# Altium PCB TYPEC_4KTransmitter-v1.0.PcbDoc (part 8 of 12)
Units mil, origin at the board's own origin, x right, y up, seen from the top; angles counter-clockwise.
Board outline 2834.7 x 1259.84 mil, 10 copper layers (Top Layer, GND-1, Signal L1, GND-2, PWR-1, PWR-2, GND-3, Signal L2, GND-4, Bottom Layer), stack 61.686 mil thick; 475 components, 338 nets, 2161 pads, 1240 vias.
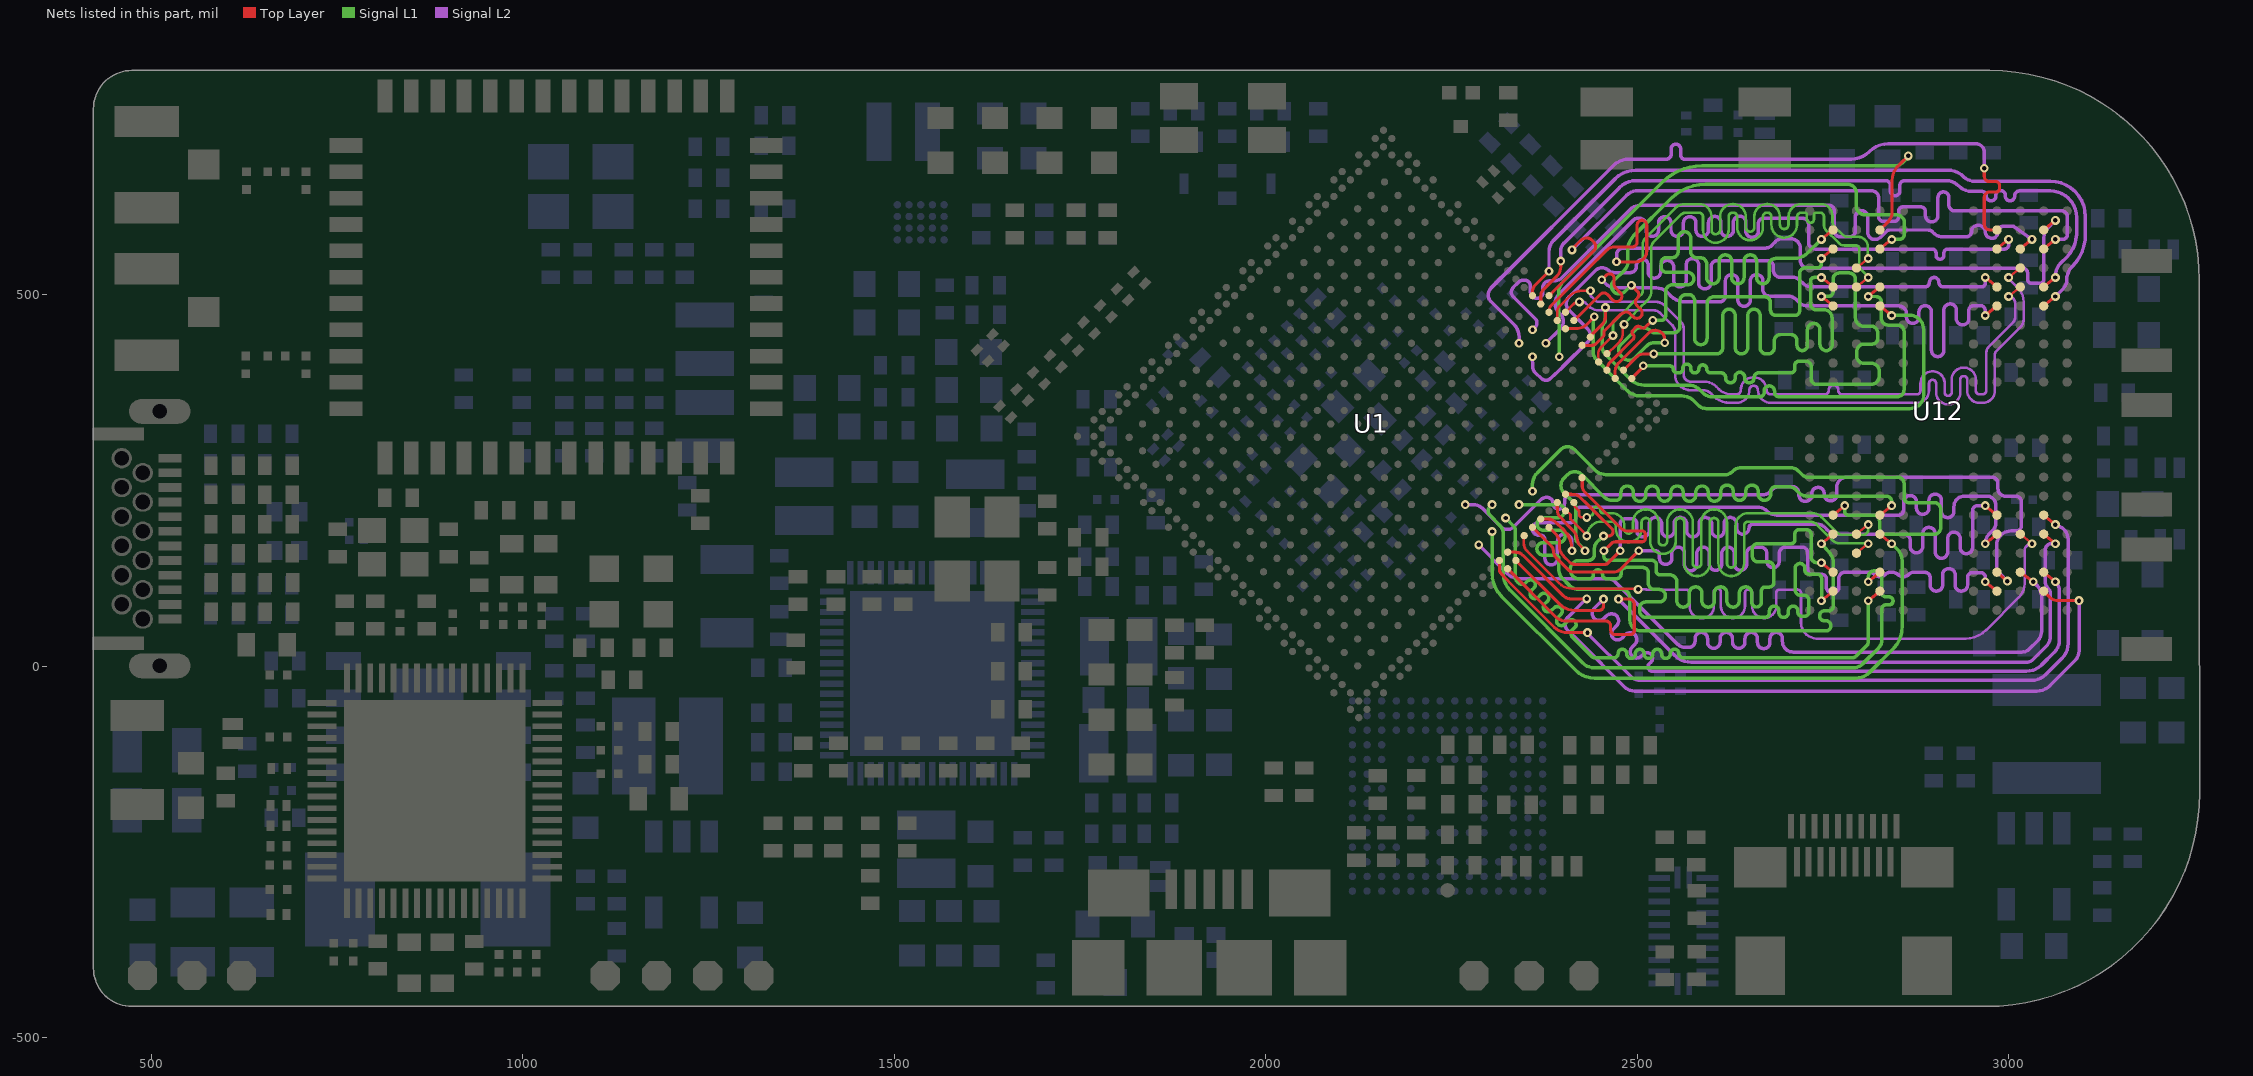
[diagram p14: the nets of this part, all layers, seen from the top]

## Via types
v1: diameter 11.81, hole 5.91, Top Layer to Bottom Layer, tented both sides, 710 vias
v2: diameter 15.75, hole 7.87, Top Layer to Bottom Layer, tented both sides, 265 vias
v3: diameter 11.81, hole 5.91, Top Layer to Signal L1, tented both sides, 146 vias
v4: diameter 11.81, hole 5.91, Signal L2 to Bottom Layer, 60 vias
v5: diameter 11.81, hole 5.91, Signal L1 to Signal L2, 38 vias
v6: diameter 11.81, hole 5.91, Top Layer to Signal L1, 16 vias
v7: diameter 11.81, hole 5.91, Top Layer to Bottom Layer, 4 vias
v8: diameter 11.81, hole 5.91, Signal L1 to Signal L2, tented both sides, 1 vias

## Nets (pads, with @x,y where several pads share a name; then routed paths per layer and width w, separated by ;. In a path a pad name is that pad's centre, name@x,y a point inside that pad or via, vN(x,y) a via of type N, cw(c..) or ccw(c..) an arc to the next point about the centre after c; other vN are vias at no path point) (continued)
LPDDR4_DM1_A: U1.1G1 U12.C10 | length 1004.7
  Top Layer w4.2: U12.C10@3015.82,561.35 v1(3031.57,574.14)
  Signal L2 w4.7: v1@2360.18,453.49 2362.87,456.18 ccw(c2357.21,461.84) 2365.21,461.84 ccw(c2357.21,461.84) 2362.87,467.49 2333.54,496.83 cw(c2340,503.3) 2330.86,503.3 cw(c2340,503.3) 2333.54,509.77 2339.93,516.16 cw(c2348.07,508) 2348.07,519.53 cw(c2348.07,511.13) 2356.47,511.13 2356.47,503.11 ccw(c2364.87,503.11) 2373.27,503.11 2373.27,509.83 cw(c2381.67,509.83) 2381.67,518.23 2388.14,518.23 ccw(c2388.14,533.23) 2398.75,522.62 ; 2398.85,522.72 2490.56,614.43 cw(c2504.07,600.93) 2504.07,620.03 2758.5,620.03 cw(c2758.5,613.2) 2765.33,613.2 2765.33,585.93 ccw(c2773.73,585.93) 2773.73,577.53 2785.47,577.53 ccw(c2785.47,585.93) 2793.87,585.93 2793.87,604.37 cw(c2802.27,604.37) 2810.67,604.37 2810.67,583.19 ccw(c2819.64,583.19) 2819.64,574.22 ccw(c2819.64,586.85) 2827.76,577.18 2835.83,585.26 cw(c2839.67,581.41) 2839.67,586.85 2891.41,586.85 cw(c2891.41,577.22) 2898.21,584.03 2900.31,581.93 ccw(c2910.94,592.56) 2910.94,577.53 2942.58,577.53 ccw(c2942.58,585.23) 2950.29,585.23 cw(c2957.99,585.23) 2957.99,592.94 cw(c2959.6,584.01) 2968.68,584.07 2969.45,581.15 ccw(c2974.86,582.58) 2970.95,578.58 ccw(c2978.26,585.95) 2977.51,575.59 2977.75,575.59 2978.34,575.59 2980.14,575.98 ccw(c2978.94,581.45) 2982.88,577.47 ccw(c2974.95,585.43) 2986.19,585.39 cw(c2992.55,585.41) 2992.55,591.77 3006.86,591.77 v1(3031.57,574.14)
  other v1: 2359.18,452.49
LPDDR4_DM1_B: U1.1A11 U12.Y10 | length 1035.7
  Top Layer w4.2: U12.Y10@3015.82,126.31 v1(3033.23,113.54)
  Signal L2 w4.7: v1(2286.8,162.97) 2325.5,124.27 ; 2325.53,124.24 ccw(c2341.74,140.44) 2341.74,117.53 ; 2341.77,117.53 2459.97,117.53 2460.03,117.53 cw(c2460.01,102.01) 2470.99,112.98 ; 2471.01,112.96 2555.16,28.81 ccw(c2564.29,37.94) 2564.29,25.03 2569.64,25.03 ccw(c2569.64,33.43) 2578.04,33.43 2578.04,36.91 cw(c2586.44,36.91) 2594.84,36.91 2594.84,32.21 ccw(c2603.24,32.21) 2611.64,32.21 2611.64,36.91 cw(c2620.04,36.91) 2628.44,36.91 2628.44,32.21 ccw(c2636.84,32.21) 2645.24,32.21 2645.24,36.91 cw(c2653.64,36.91) 2662.04,36.91 2662.04,31.72 ccw(c2670.44,31.72) 2678.84,31.72 2678.84,36.91 cw(c2687.24,36.91) 2695.64,36.91 2695.64,33.43 ccw(c2710.37,33.43) 2710.37,18.7 3017.65,18.7 ; 3017.68,18.7 ccw(c3017.68,33.46) 3028.12,23.03 3039.26,34.16 ccw(c3026.82,46.6) 3044.41,46.6 3044.41,93.76 ccw(c3023.74,93.79) 3038.35,108.41 v1(3033.23,113.54)
LPDDR4_DQ0_A: U1.G2 U12.B2 | length 748.4
  Top Layer w4.2: U1.G2@2459.41,398.21 cw(c2474.7,398.21) 2459.97,402.33 cw(c2474.7,398.21) 2463.89,409.02 2494.61,439.74 ccw(c2491.48,442.88) 2494.61,446.01 cw(c2497.75,449.15) 2494.61,452.28 2498.31,455.98 cw(c2501.45,452.85) 2504.58,455.98 ccw(c2507.72,459.12) 2510.54,455.7 2510.83,455.96 v1(2521.06,465.19) ; v1(2748.1,574.14) U12.B2@2763.85,586.94
  Signal L1 w4.7: v1(2521.06,465.19) 2521.25,465.38 2532.63,465.38 ccw(c2532.63,471.08) 2538.33,471.08 2538.33,503.65 cw(c2547.74,503.65) 2547.74,513.06 2568.09,513.06 ccw(c2568.09,521.46) 2568.09,529.86 2539.94,529.86 cw(c2539.94,537.44) 2532.36,537.44 2532.36,542.57 cw(c2539.33,542.57) 2539.33,549.55 2546.94,549.55 ccw(c2546.94,557.95) 2555.34,557.95 2555.34,576.19 cw(c2563.74,576.19) 2572.14,576.19 2572.14,557.95 ccw(c2580.54,557.95) 2580.54,549.55 2585.22,549.55 cw(c2585.22,541.15) 2593.62,541.15 2593.62,522.94 ccw(c2602.02,522.94) 2610.42,522.94 2610.42,545.04 cw(c2618.82,545.04) 2627.22,545.04 2627.22,522.94 ccw(c2635.62,522.94) 2644.02,522.94 2644.02,545.04 cw(c2652.42,545.04) 2660.82,545.04 2660.82,522.94 ccw(c2669.22,522.94) 2677.62,522.94 2677.62,539.61 cw(c2686.56,539.61) 2686.56,548.55 2711.37,548.55 ccw(c2711.37,574.68) 2729.86,556.2 2747.76,574.11 v1(2748.1,574.14)
LPDDR4_DQ0_B: U1.B12 U12.AA2 | length 857.7
  Top Layer w4.2: U1.B12@2403.73,231.17 2411.83,231.17 2415.41,230.99 cw(c2414.86,220.04) 2422.47,227.94 2433.76,217.09 2445.05,205.79 2466.33,184.52 cw(c2462.71,180.9) 2467.83,180.9 cw(c2462.71,180.9) 2466.33,177.28 2465.95,176.9 cw(c2461.42,181.44) 2461.42,175.03 v1(2454.86,175.03) ; v1(2748.1,87.92) U12.AA2@2763.85,100.72
  Signal L1 w4.7: v1(2454.86,175.03) 2446.55,167.3 ccw(c2454.86,158.36) 2442.65,158.36 2442.65,150.65 cw(c2434,150.65) 2434,142 2422,142 ccw(c2422,129.82) 2409.82,129.82 ccw(c2422.12,129.82) 2422.12,117.53 2436.69,117.53 ccw(c2436.69,121.67) 2440.84,121.67 2440.84,122.97 cw(c2447.19,122.97) 2447.19,129.32 cw(c2447.19,122.97) 2453.54,122.97 ccw(c2458.98,122.97) 2458.98,117.53 2472.21,117.53 ccw(c2472.21,123.75) 2478.43,123.75 2478.43,126.13 cw(c2484.89,126.13) 2484.89,132.59 2508,132.59 cw(c2508,125.44) 2515.16,125.44 2515.16,111.41 ccw(c2523.56,111.41) 2522.25,103.11 2529.68,103.11 cw(c2529.68,94.61) 2529.78,103.11 cw(c2529.68,94.61) 2538.18,94.61 cw(c2529.78,94.61) 2529.78,86.21 2511.42,86.21 ccw(c2511.42,78.19) 2503.4,78.19 2503.4,74.21 ccw(c2512.25,74.21) 2512.25,65.36 2671.86,65.36 ccw(c2671.86,71.71) 2673.89,65.69 ccw(c2671.86,71.71) 2678.21,71.71 2678.21,74.21 cw(c2684.59,74.21) 2684.62,80.59 cw(c2684.59,74.27) 2690.91,74.27 2690.91,71.71 ccw(c2697.26,71.71) 2697.26,65.36 ccw(c2697.26,71.71) 2703.61,71.71 2703.61,74.21 cw(c2709.99,74.21) 2709.99,80.59 cw(c2709.99,74.28) 2716.31,74.28 2716.31,72.76 ccw(c2722.35,72.76) 2722.35,66.72 2725.42,66.72 ccw(c2725.42,72.14) 2730.84,72.14 2730.84,89.67 ccw(c2725.48,89.67) 2725.48,95.03 2720.54,95.03 cw(c2720.54,102.91) 2712.66,102.91 2712.66,131.46 cw(c2719.26,131.45) 2725.8,132.38 2725.8,128.85 ccw(c2730.91,128.85) 2730.91,123.74 2742.64,123.74 cw(c2742.64,118.08) 2748.31,118.08 v1@2748.31,88.12
LPDDR4_DQ1_A: U1.F2 U12.C2 | length 749
  Top Layer w4.2: U1.F2@2470.54,387.07 2470.54,397 cw(c2485.54,397) 2474.94,407.61 2515.48,448.16 cw(c2524.51,439.16) 2524.56,451.91 cw(c2524.51,439.06) 2537.36,439.06 v1(2537.36,435.03) ; v1(2748.1,548.54) U12.C2@2763.85,561.35
  Signal L1 w4.7: 2496.22,414.07 cw(c2489.75,420.56) 2489.55,411.4 cw(c2489.75,424.44) 2480.54,415.21 2479.09,416.67 cw(c2488.38,426.01) 2475.2,426.06 cw(c2484.04,426.06) 2477.78,432.3 2498.06,452.58 cw(c2505.64,445.01) 2504.9,455.69 ; 2496.27,414.13 2512.94,430.8 cw(c2523.12,420.67) 2523.12,435.03 v1(2537.36,435.03) ; 2505.48,455.69 cw(c2505.48,434.76) 2520.29,449.56 ccw(c2522.4,451.67) 2522.4,448.69 2549.86,448.69 ccw(c2549.86,456.38) 2557.43,455.08 2557.43,491.19 cw(c2566.17,491.19) 2566.17,499.92 2569.48,499.92 cw(c2569.48,491.99) 2577.42,491.99 2577.42,440.87 ccw(c2585.82,440.87) 2594.22,440.87 2594.22,487.97 cw(c2603.2,487.97) 2603.2,496.95 2671.66,496.95 cw(c2671.66,489.1) 2679.52,489.1 2679.52,479.09 ccw(c2686.58,479.09) 2686.58,472.03 2712.68,472.03 ccw(c2712.68,478.21) 2718.87,478.21 2718.87,528.24 cw(c2726.53,528.24) 2726.53,535.91 2742.89,535.91 ccw(c2742.89,541.12) 2748.1,541.12 v1(2748.1,548.54)
LPDDR4_DQ1_B: U1.B10 U12.Y2 | length 867.6
  Top Layer w4.2: U1.B10@2426,253.44 2426.16,245.59 2426.16,241.68 2426.24,241.05 ccw(c2437.14,242.31) 2429.16,234.77 ; 2429.16,234.77 2478.99,184.94 ccw(c2486.64,192.59) 2486.64,181.78 2506.68,181.78 cw(c2506.68,177.38) 2511.08,177.38 2511.08,171.52 cw(c2506.73,171.52) 2506.73,167.18 2471.01,167.18 ccw(c2471.01,159.36) 2466.03,165.39 ccw(c2471.01,159.36) 2465.48,164.89 ccw(c2468.24,161.85) 2465.38,164.8 v1(2455.36,155.03) ; v1(2748.1,139.1) U12.Y2@2763.85,126.31
  Signal L1 w4.7: v1(2455.36,155.03) 2455.36,147.61 ccw(c2460.85,147.61) 2460.85,142.13 2519.99,142.13 cw(c2519.99,136.29) 2525.83,136.29 2525.83,127.56 ccw(c2530.64,127.56) 2530.64,122.75 2543.62,122.75 cw(c2543.62,112.74) 2553.62,112.74 2553.62,87.68 ccw(c2562.02,87.68) 2570.42,87.68 2570.42,98.17 cw(c2578.82,98.17) 2587.22,98.17 2587.22,87.68 ccw(c2595.62,87.68) 2604.02,87.68 2604.02,98.17 cw(c2612.42,98.17) 2620.82,98.17 2620.82,87.68 ccw(c2629.22,87.68) 2637.62,87.68 2637.62,98.17 cw(c2646.02,98.17) 2654.42,98.17 2654.42,85.83 ccw(c2660.86,85.83) 2667.29,85.83 2667.29,101.18 cw(c2672.43,101.18) 2672.43,106.32 2678.25,106.32 ccw(c2678.25,111.98) 2683.91,111.98 2683.91,132.75 ccw(c2676.43,132.75) 2676.43,140.23 2663.07,140.23 cw(c2663.07,148.32) 2654.98,148.32 2654.98,157.2 cw(c2662.59,157.2) 2662.59,164.81 2707.65,164.81 ccw(c2707.65,169.57) 2712.42,169.57 2712.42,177.79 cw(c2718.28,177.79) 2718.28,183.65 2727.56,183.65 cw(c2727.56,176.88) 2734.33,176.88 2734.33,146.99 ccw(c2742.22,146.99) 2742.22,139.1 v1(2748.1,139.1)
LPDDR4_DQ2_A: U1.F1 U12.E2 | length 742.8
  Top Layer w4.2: U1.F1@2481.68,398.2 2499.11,415.63 cw(c2509.71,405.03) 2509.71,420.03 v1(2522.36,420.03) ; v1(2748.1,522.96) U12.E2@2763.85,510.17
  Signal L1 w4.7: v1(2522.36,420.03) 2606.91,420.03 ccw(c2606.91,428.43) 2615.31,428.43 2615.31,471.73 cw(c2623.71,471.73) 2632.11,471.73 2632.11,428.43 ccw(c2640.51,428.43) 2648.91,428.43 2648.91,471.73 cw(c2657.31,471.73) 2665.71,471.73 2665.71,428.43 ccw(c2674.11,428.43) 2674.11,420.03 2676.16,420.03 ccw(c2676.16,428.43) 2684.56,428.43 2684.56,437.47 cw(c2693.28,437.47) 2693.28,446.19 2706.61,446.19 cw(c2706.61,437.62) 2715.18,437.62 2715.18,431.7 ccw(c2722.27,431.66) 2729.36,431.65 ; 2729.36,431.68 2729.36,452.71 cw(c2737.76,452.76) 2746.16,452.76 2746.16,433.06 ccw(c2754.67,433.06) 2754.67,424.54 ccw(c2754.67,432.34) 2762.47,432.34 2762.47,468.49 2762.47,468.55 ccw(c2751.38,468.54) 2751.37,479.63 2740.49,479.63 ; 2740.45,479.63 cw(c2740.56,486.66) 2733.53,486.67 2733.53,486.72 2733.53,502.69 2733.53,518.16 cw(c2738.33,518.16) 2738.33,522.96 v1(2748.1,522.96)
LPDDR4_DQ2_B: U1.1A8 U12.V2 | length 847.1
  Top Layer w4.2: v1(2748.1,164.69) U12.V2@2763.85,177.49
  Signal L1 w4.7: v1(2341.09,217.25) 2393.7,217.26 cw(c2393.7,208.65) 2402.3,208.65 cw(c2393.33,208.65) 2393.33,199.69 2373.69,199.69 ccw(c2373.69,191.29) 2373.69,182.89 2394.76,182.89 cw(c2394.76,174.49) 2394.76,166.09 2373.66,166.09 ccw(c2373.66,157.69) 2373.66,149.29 2389.54,149.29 cw(c2389.54,143.96) 2394.86,143.96 ; 2394.89,143.96 2394.89,128.66 ccw(c2409.89,128.71) 2399.27,118.11 2408.98,108.4 ccw(c2421.47,120.88) 2421.47,103.23 2479.32,103.23 cw(c2479.32,92.24) 2490.31,92.24 2490.31,62.02 ccw(c2505.03,62.02) 2505.03,47.3 2754.19,47.3 ccw(c2754.19,54.04) 2760.93,54.04 ccw(c2754.18,54.04) 2754.53,60.78 2753.25,60.79 2751.96,60.79 cw(c2752.31,67.53) 2745.56,67.53 cw(c2752.31,67.53) 2752.31,74.28 2757.74,74.28 ccw(c2757.74,80.59) 2764.06,80.59 2764.06,139.07 ccw(c2743.23,139.03) 2758.24,153.48 2757.88,153.85 v1(2748.1,164.69)
LPDDR4_DQ3_A: U1.E1 U12.F2 | length 739.7
  Top Layer w4.2: U1.E1@2492.81,387.19 2508.36,402.74 v1(2508.36,404.05) ; v1(2748.1,497.37) U12.F2@2763.85,484.58
  Signal L1 w4.7: v1@2508.59,403.81 2520.34,403.81 2544.74,403.81 cw(c2544.74,399.89) 2548.65,399.89 ccw(c2554,399.89) 2554,394.54 2556.35,394.54 ccw(c2556.35,399.89) 2561.7,399.89 2561.7,400.99 cw(c2567.05,400.99) 2572.4,400.99 2572.4,399.71 ccw(c2577.75,399.71) 2583.1,399.71 2583.1,399.89 cw(c2588.45,399.89) 2593.8,399.89 ccw(c2599.15,399.89) 2599.15,394.54 2612.94,394.54 cw(c2612.94,388.19) 2619.29,388.19 2619.29,387.41 ccw(c2625.64,387.41) 2631.99,387.41 2631.99,389.02 cw(c2638.34,389.02) 2644.69,389.02 2644.69,387.41 ccw(c2651.04,387.41) 2657.39,387.41 2657.39,388.19 cw(c2663.74,388.19) 2663.74,394.54 2678.05,394.54 2680.4,394.54 2707.22,394.54 ccw(c2707.22,399.55) 2712.22,399.55 2712.22,404.38 cw(c2718.23,404.38) 2718.23,410.38 2727.02,410.38 cw(c2727.02,403.1) 2734.3,403.1 2734.3,386.24 ccw(c2741.37,386.24) 2741.37,379.18 2815.65,379.18 ccw(c2815.63,389.35) 2825.79,388.85 ccw(c2821.09,389.05) 2825.79,389.05 2825.79,397.17 ccw(c2815.48,397.17) 2815.48,407.47 2804.86,407.47 cw(c2804.82,416.58) 2795.71,416.62 2795.71,423.33 cw(c2805.78,423.33) 2805.78,433.39 2816.68,433.39 ccw(c2816.68,440.45) 2823.74,440.45 2823.74,448.6 ccw(c2814.86,448.6) 2814.86,457.48 2804.95,457.48 cw(c2804.95,468.53) 2793.9,468.53 2793.9,520.68 ccw(c2785.6,520.68) 2785.6,528.97 2771.85,528.97 ccw(c2771.85,520.97) 2763.84,520.97 2763.84,503.99 cw(c2757.22,503.99) 2757.22,497.37 v1(2748.1,497.37)
LPDDR4_DQ3_B: U1.1A7 U12.U2 | length 847.3
  Top Layer w4.2: U12.U2@2763.85,203.08 v1(2779.6,215.87)
  Signal L1 w4.7: v1@2358.74,234.76 2359.18,244.11 ccw(c2353.58,244.37) 2359.18,244.37 cw(c2380.97,244.37) 2365.56,259.78 2396.92,291.14 cw(c2406.43,281.63) 2406.43,295.07 cw(c2406.43,281.63) 2415.92,291.15 2443.49,263.59 2443.53,263.54 ccw(c2458.08,278.13) 2458.08,257.53 ; 2458.11,257.53 2618.09,257.53 ccw(c2618.09,272.53) 2628.69,261.91 2629.01,262.24 cw(c2640.47,250.78) 2640.47,266.99 2706.48,266.99 cw(c2706.48,251.99) 2717.08,262.6 2722.11,257.57 ccw(c2730.3,265.76) 2730.3,254.18 2851.17,254.18 cw(c2851.17,246.06) 2859.29,246.06 2859.29,226.6 ccw(c2866,226.6) 2866,219.89 2899.67,219.89 cw(c2899.67,211.03) 2908.53,211.03 2908.53,185.88 cw(c2900.04,185.88) 2900.04,177.39 2832.09,177.39 cw(c2832.09,183.13) 2826.36,183.13 2826.36,195.09 ccw(c2818.36,195.09) 2818.36,203.09 2784.36,203.09 cw(c2784.36,207.84) 2779.6,207.84 v1(2779.6,215.87)
  other v1: 2359.18,235.35
LPDDR4_DQ4_A: U1.M2 U12.F4 | length 741.6
  Top Layer w4.2: U1.M2@2403.73,454.48 2420.36,454.48 ccw(c2420.36,469.82) 2430.06,457.94 2431.2,458.88 v3(2442.36,470.03) ; U12.F4@2826.84,484.58 v1@2842.6,472.16
  Signal L1 w4.7: v3(2442.36,470.03) 2441.12,468.79 2441.12,423.14 ccw(c2457.71,423.13) 2446.02,411.37 2446.07,411.31 2465.29,392.1 2486.71,370.67 ; 2486.74,370.65 ccw(c2503.55,387.46) 2503.55,363.68 ; 2503.59,363.68 2560.04,363.68 cw(c2560.04,340.42) 2576.49,356.87 2582.36,351 ccw(c2593.27,361.91) 2593.27,346.48 2867.35,346.48 ccw(c2867.35,364.88) 2885.74,364.88 2885.74,453.05 ccw(c2866.63,453.05) 2866.63,472.16 v1@2842.6,472.16
  other v1: 2842.6,471.78
LPDDR4_DQ4_B: U1.B13 U12.U4 | length 854.5
  Top Layer w4.2: U1.B13@2392.59,220.04 2392.59,214.08 2392.76,208.56 ccw(c2403.73,208.9) 2395.76,201.36 2408.92,187.46 2412.84,183.54 ; 2412.87,183.51 cw(c2395.02,166.13) 2419.26,171.9 2421.11,164.11 v1(2429.95,155.03) ; U12.U4@2826.84,203.08 v1(2842.59,215.87)
  Signal L1 w4.7: v1@2429.95,155.89 2420.01,165.83 cw(c2426.52,172.28) 2417.36,172.28 2417.36,213.17 ccw(c2407.42,213.13) 2414.45,220.15 2401.57,233.03 cw(c2411.35,242.85) 2397.49,242.91 cw(c2411.63,242.86) 2401.63,252.86 2406.02,257.25 cw(c2416.02,247.25) 2416.02,261.39 cw(c2416.02,246.96) 2426.23,257.17 2456.71,226.69 ; 2456.71,226.68 ccw(c2465.92,235.91) 2465.92,222.87 2471.32,222.87 ccw(c2471.32,229.82) 2478.27,229.82 2478.27,233.91 cw(c2486.67,233.91) 2495.07,233.91 2495.07,230.11 ccw(c2503.47,230.11) 2511.81,229.1 2511.87,229.16 2511.87,233.91 cw(c2520.27,233.91) 2528.67,233.91 2528.67,230.11 ccw(c2537.07,230.11) 2543.26,224.43 ccw(c2537.91,229.77) 2545.47,229.77 2545.47,233.91 cw(c2553.87,233.91) 2562.27,233.91 2562.27,230.11 ccw(c2570.67,230.11) 2579.07,230.11 2579.07,233.91 cw(c2587.47,233.91) 2595.87,233.91 2595.87,230.11 ccw(c2604.27,230.11) 2612.65,229.62 2612.65,235.19 ; 2612.67,235.21 cw(c2621.07,235.21) 2629.47,235.21 2629.47,231.4 ccw(c2637.87,231.4) 2646.27,231.4 2646.27,235.21 cw(c2654.67,235.21) 2663.07,235.21 2663.11,235.16 2663.11,230.51 ccw(c2671.47,231.4) 2679.87,231.4 2679.87,234.68 cw(c2686.66,234.68) 2686.66,241.47 2704.08,241.47 cw(c2704.08,228.35) 2713.36,237.63 2717.57,233.41 ccw(c2729.03,244.87) 2729.03,228.66 2835.34,228.66 cw(c2835.34,221.41) 2842.59,221.41 v1(2842.59,215.87)
LPDDR4_DQ5_A: U1.K1 U12.E4 | length 743
  Top Layer w4.2: U1.K1@2437.14,442.75 2437.14,444.01 2452.93,459.81 ccw(c2442.26,470.48) 2457.36,470.48 2457.36,476.73 v3(2457.36,482.53) ; v1(2811.1,497.33) U12.E4@2826.84,510.17
  Signal L1 w4.7: v3(2457.36,482.53) 2457.36,465.94 cw(c2449.73,465.94) 2455.13,460.56 2454.8,460.23 ccw(c2459.41,455.62) 2452.89,455.62 2452.89,443.62 2452.89,430.22 ccw(c2468.21,430.22) 2457.36,419.4 2461.9,414.86 2472.45,404.32 2491.04,385.73 ; 2491.07,385.69 ccw(c2509.34,403.96) 2509.34,378.13 ; 2509.37,378.13 2569.06,378.13 cw(c2569.06,356.65) 2584.25,371.84 2588.29,367.79 ccw(c2601.17,380.67) 2601.17,362.46 2665.28,362.46 ccw(c2665.28,368.29) 2670.92,366.84 2670.91,369.9 cw(c2677.98,369.92) 2685.05,369.9 2685.04,366.84 ccw(c2690.68,368.29) 2690.68,362.46 2850.14,362.46 ccw(c2850.14,371.61) 2859.29,371.61 2859.29,450.34 ccw(c2850.68,450.34) 2850.68,458.95 2837.74,458.95 cw(c2837.74,467.9) 2828.79,467.9 2828.79,490.15 ccw(c2821.61,490.15) 2821.61,497.33 v1(2811.1,497.33)
LPDDR4_DQ5_B: U1.1A10 U12.V4 | length 847
  Top Layer w4.2: U12.V4@2826.84,177.49 v1(2842.59,164.69)
  Signal L1 w4.7: v1(2304.9,181.06) 2304.9,124.49 ccw(c2347.82,124.36) 2317.38,94.1 2417.23,-5.76 2417.31,-5.83 ccw(c2442.91,19.72) 2442.99,-16.45 2794.01,-16.45 ; 2794.04,-16.45 ccw(c2794.06,10.07) 2812.83,-8.67 2846,24.5 ccw(c2815.87,51.9) 2856.59,51.89 ; v1(2842.59,164.69) 2850.76,156.53 cw(c2836.67,142.44) 2856.59,142.44 2856.59,51.94
LPDDR4_DQ6_A: U1.K2 U12.C4 | length 753.3
  Top Layer w4.2: U1.K2@2426,431.61 2439.17,431.61 ccw(c2439.15,439.52) 2444.74,433.93 2455.56,444.74 2455.56,450.68 2478.14,473.26 cw(c2485.76,465.64) 2485.76,476.42 cw(c2485.76,469.95) 2490.33,474.52 2494.87,469.98 ccw(c2499.84,474.98) 2504.83,479.96 2499.95,484.85 cw(c2504.94,489.83) 2499.95,494.81 ; v3(2492.36,512.53) 2500.48,504.4 cw(c2495.95,499.87) 2502.36,499.87 cw(c2495.95,499.87) 2500.48,495.35 ; U12.C4@2826.84,561.35 v1(2842.64,574.09)
  Signal L1 w4.7: 2487.36,558.84 2487.36,543.02 cw(c2472.73,543.02) 2483.09,532.7 2468.13,517.74 ccw(c2471.48,514.44) 2467.68,517.21 ccw(c2476.09,511.13) 2468.69,503.86 ccw(c2476.27,511.39) 2475.12,500.77 ccw(c2475.6,505.45) 2475.62,500.75 ccw(c2475.4,513.23) 2484.23,504.4 v3(2492.36,512.53) ; 2487.36,558.88 cw(c2516.54,558.88) 2495.9,579.51 2545.15,628.76 cw(c2592.73,581.18) 2592.73,648.47 2783.38,648.47 cw(c2783.38,637) 2794.86,637 2794.86,619.04 ccw(c2806.37,619.04) 2806.37,607.53 2848.49,607.53 cw(c2848.49,596.16) 2859.86,596.16 2859.86,581.37 cw(c2852.62,581.37) 2852.62,574.14 2842.69,574.14 v1(2842.64,574.09)
LPDDR4_DQ6_B: U1.1B9 U12.Y4 | length 847.1
  Top Layer w4.2: v1(2811.1,113.5) U12.Y4@2826.84,126.31
  Signal L1 w4.7: v1(2304.9,217.25) 2301.61,213.78 ccw(c2306.74,208.65) 2301.61,203.52 2315.49,188.88 2315.64,188.72 cw(c2304.68,177.99) 2320.02,178 2320.02,124 ccw(c2350.88,123.85) 2329.02,102.07 2329.08,102.01 2427.27,3.82 2427.33,3.77 ccw(c2441.91,18.28) 2441.96,-2.3 2791.09,-2.3 2791.18,-2.3 ccw(c2791.29,15.1) 2803.49,2.7 2825.07,24.28 ccw(c2814.33,35.03) 2829.53,35.03 ; v1(2811.1,113.5) 2811.1,119.49 cw(c2819.89,119.49) 2819.89,128.29 cw(c2819.89,118.65) 2829.53,118.65 2829.53,98.33 ccw(c2834.88,98.33) 2834.88,92.98 2839.2,92.98 cw(c2839.2,87.63) 2839.2,82.28 2834.88,82.28 ccw(c2834.88,76.93) 2829.53,76.93 2829.53,35.06
LPDDR4_DQ7_A: U1.1E1 U12.B4 | length 746
  Top Layer w4.2: U12.B4@2826.84,586.94 2837.9,597.99 ; 2837.91,598.01 ccw(c2825.02,610.86) 2843.23,610.86 2843.23,649.09 2843.23,653.66 cw(c2870.36,653.66) 2851.17,672.85 2854.41,676.08 v3(2864.86,686.53)
  Signal L1 w4.7: v1(2395.37,416.3) 2394.59,503.03 2394.59,503.09 cw(c2415.55,502.94) 2400.73,517.76 2534.02,651.05 cw(c2587.55,597.55) 2587.55,673.23 2846.84,673.23 ccw(c2846.84,688.23) 2857.44,677.61 v3@2864.86,685.03
LPDDR4_DQ7_B: U1.1A9 U12.AA4 | length 851.1
  Top Layer w4.2: v1(2811.1,87.92) U12.AA4@2826.84,100.72
  Signal L1 w4.7: v1(2322.99,199.16) 2334.02,188.14 cw(c2329.28,183.4) 2335.98,183.4 2335.98,132.59 2335.98,120.18 ccw(c2346.42,120.18) 2339.33,112.52 ccw(c2346.42,120.18) 2346.42,109.74 2346.99,109.74 ccw(c2344.91,115.96) 2349.56,111.34 2352.43,114.2 cw(c2356.92,109.71) 2361.41,114.2 cw(c2356.92,109.71) 2361.41,105.22 2357.76,101.58 ccw(c2362.25,97.08) 2357.76,92.59 ccw(c2362.25,97.08) 2366.74,92.59 2370.39,96.24 cw(c2374.88,91.75) 2379.37,96.24 cw(c2374.88,91.75) 2379.37,87.26 2375.72,83.61 ccw(c2380.21,79.12) 2375.72,74.63 ccw(c2380.21,79.12) 2384.7,74.63 2388.35,78.28 cw(c2392.84,73.79) 2397.33,78.28 cw(c2392.84,73.79) 2397.33,69.3 2393.75,65.72 2393.57,65.55 ccw(c2398.06,60.86) 2402.65,56.27 2406.78,60.41 2406.89,60.41 ; 2406.99,60.51 cw(c2411.51,55.85) 2417.46,53.23 ; 2417.36,53.13 2416.5,52.28 ; 2418.01,55.92 cw(c2412.86,55.92) 2416.5,52.28 ; v1(2811.1,87.92) 2811.1,31.93 cw(c2805.25,31.93) 2809.41,27.82 2794.66,13.06 cw(c2789.83,17.89) 2789.84,11.07 2561.9,11.07 cw(c2561.9,16.67) 2556.3,16.67 ccw(c2550.45,16.67) 2544.6,16.67 2544.58,15.74 cw(c2539.89,15.82) 2544.46,14.74 cw(c2538.75,16.1) 2533.03,14.78 cw(c2537.61,15.82) 2532.92,15.69 2532.92,15.74 2532.9,16.67 ccw(c2527.05,16.67) 2521.2,16.67 2521.2,16.1 cw(c2515.35,16.1) 2509.51,16.04 2509.51,16.13 2509.5,16.67 ccw(c2503.65,16.67) 2497.8,16.67 2497.8,16.1 cw(c2491.95,16.1) 2486.1,16.1 2486.1,16.67 ccw(c2480.25,16.67) 2474.4,16.67 cw(c2468.8,16.67) 2468.8,11.07 2443.9,11.07 cw(c2443.88,18.57) 2438.62,13.22 2413.1,38.74 cw(c2418.17,43.81) 2411,43.81 cw(c2418.17,43.81) 2413.09,48.87 2416.5,52.28
LPDDR4_DQ8_A: U1.P2 U12.B11 | length 1035
  Top Layer w4.2: U1.P2@2381.46,476.71 2382.06,479.8 cw(c2388.68,479.8) 2383.99,484.48 2459.41,559.9 cw(c2469.26,550.05) 2469.26,563.98 2493.24,563.98 ccw(c2493.24,570.76) 2500.02,570.76 2500.02,593.41 cw(c2506.52,593.41) 2513.02,593.41 2513.02,558.25 cw(c2498.8,558.25) 2498.8,544.03 v1(2472.36,544.03) ; U12.B11@3047.31,586.94 v1(3063.06,599.73)
  Signal L2 w4.7: v1(2472.36,544.03) 2472.36,553.01 cw(c2481.87,553.01) 2481.87,562.53 2672.87,562.53 ccw(c2672.87,574.05) 2681.01,565.89 2684.86,569.74 cw(c2695.2,562.47) 2695.2,575.11 2706.97,575.11 cw(c2706.97,562.47) 2719.61,562.47 2719.61,545.71 ; 2719.61,545.91 ccw(c2729.86,545.91) 2729.86,535.67 3018.56,535.67 cw(c3018.56,528.4) 3025.83,528.4 3025.83,520.24 ccw(c3031.03,520.24) 3031.03,515.04 3042.31,515.04 ccw(c3042.31,520.21) 3047.49,520.21 3047.49,577.05 ; 3047.49,577.07 cw(c3064.97,576.91) 3052.63,589.29 v1(3063.06,599.73)
LPDDR4_DQ8_B: U1.B19 U12.AA11 | length 1052.7
  Top Layer w4.2: U1.B19@2325.78,153.22 2337.08,153.06 cw(c2337.08,140.42) 2346,149.37 ; 2346.01,149.36 2400.65,94.72 ccw(c2411.31,105.38) 2411.31,90.3 v1(2432.36,90.37) ; U12.AA11@3047.31,100.72 3055.31,92.72 ccw(c3066.67,104.12) 3066.67,88.03 v1(3094.86,88.03)
  Signal L2 w4.7: v1(2432.36,90.37) 2431.57,90.37 2406.53,65.34 ccw(c2415.37,56.5) 2402.87,56.5 ccw(c2413.7,56.5) 2406.03,48.85 2421.94,32.94 2482.72,-27.83 ccw(c2496.66,-14.05) 2496.69,-33.66 3037.96,-33.66 ccw(c3038,-7.99) 3056.15,-26.14 3089.15,6.86 ccw(c3075.44,20.61) 3094.86,20.61 v1(3094.86,88.03)
LPDDR4_DQ9_A: U1.R1 U12.C11 | length 1019.1
  Top Layer w4.2: U1.R1@2381.46,498.57 2441.79,558.91 ccw(c2436.31,564.44) 2444.1,564.45 ccw(c2435.16,564.44) 2441.48,570.76 2438.83,573.41 ccw(c2432.29,566.8) 2432.25,576.1 ccw(c2432.29,564.36) 2423.93,572.61 2412.35,560.92 v1(2412.36,560.03) ; U12.C11@3047.44,561.35 v1@3063.11,574.08
  Signal L2 w4.7: v1(2412.36,560.03) 2485.46,633.13 cw(c2501.74,616.85) 2501.74,639.88 2815.47,639.88 cw(c2815.47,630.29) 2824.86,632.26 cw(c2815.47,630.29) 2825.06,630.29 2825.06,604.92 ccw(c2831.55,604.92) 2831.55,598.43 2846.03,598.43 ccw(c2846.03,604.4) 2852,604.4 2852,612.1 cw(c2857.93,612.1) 2857.93,618.03 2881.84,618.03 cw(c2881.84,611.7) 2888.17,611.7 2888.17,606.22 ccw(c2896.57,606.22) 2904.97,606.22 2904.97,630.65 ; 2904.97,630.69 cw(c2912.33,630.72) 2919.69,630.64 2919.69,630.5 2919.69,620.7 ccw(c2927.86,620.7) 2927.86,612.53 ; 2927.89,612.53 3071.54,612.53 ; v1(3063.06,574.14) 3072.8,574.14 ccw(c3072.8,580.54) 3079.2,580.54 3079.2,605.32 ccw(c3074.5,605.32) 3079.17,605.84 ccw(c3071.67,604.98) 3071.57,612.53
LPDDR4_DQ9_B: U1.A19 U12.Y11 | length 1052.3
  Top Layer w4.2: U1.A19@2336.92,142.09 2395.88,83.12 ccw(c2415.91,103.15) 2415.91,74.83 2448.75,74.83 ccw(c2448.75,80.93) 2454.86,80.93 v1(2454.86,90.03) ; U12.Y11@3047.31,126.31 v1(3063.06,113.51)
  Signal L2 w4.7: v1(2454.86,90.03) 2442.57,77.73 2442.53,77.69 ccw(c2449.49,70.68) 2439.61,70.68 ccw(c2448.92,70.68) 2455.52,64.12 2458.92,67.52 cw(c2465.65,60.76) 2472.39,54.01 2467.84,49.46 ; 2467.82,49.44 ccw(c2473.76,43.5) 2479.69,37.55 2484.26,42.12 cw(c2490.71,35.69) 2497.14,29.26 2493.44,25.55 ccw(c2499.54,19.4) 2505.7,13.31 ; 2505.72,13.33 2508.17,15.78 cw(c2513.44,10.53) 2518.68,5.26 2516.39,2.97 ccw(c2520.41,-1.05) 2514.72,-1.05 ccw(c2520.72,-1.05) 2520.72,-7.04 3006.33,-7.04 3023.98,-7.04 ccw(c3023.98,21.84) 3044.41,1.42 3061.69,18.7 ; 3061.71,18.71 ccw(c3045.45,34.94) 3068.42,34.94 3068.42,100.58 ccw(c3050.14,100.58) 3066.07,109.55 ccw(c3050.14,100.58) v1(3063.06,113.51)
LPDDR4_DQ10_A: U1.R2 U12.E11 | length 1012.1
  Top Layer w4.2: U1.R2@2370.32,487.29 2370.32,497.95 cw(c2382.54,497.93) 2373.9,506.56 2392.06,524.72 ccw(c2379.24,537.52) 2397.36,537.52 v1(2397.36,545.03) ; U12.E11@3047.31,510.17 v1(3063.06,522.96)
  Signal L2 w4.7: v1(2397.36,545.03) 2397.36,558.81 cw(c2412.36,558.81) 2401.75,569.42 2476.28,643.95 cw(c2498.69,621.56) 2498.72,653.24 2834.64,653.24 cw(c2834.64,646.89) 2840.99,646.89 2840.99,639.37 ccw(c2847.34,639.37) 2853.69,639.37 2853.69,646.89 cw(c2860.04,646.89) 2860.04,653.24 2917.92,653.24 cw(c2917.92,637.52) 2923.93,652.04 cw(c2912.68,624.87) 2933.46,645.68 ; 2933.49,645.65 ccw(c2949.75,661.94) 2949.77,638.93 2963.84,638.93 cw(c2963.84,632.58) 2970.19,632.58 2970.19,632.49 ccw(c2976.54,632.49) 2982.89,632.49 2982.89,633.63 cw(c2989.24,633.63) 2995.59,633.63 2995.59,632.49 ccw(c3001.94,632.49) 3008.29,632.49 cw(c3015.35,632.59) 3015.35,639.65 3055.83,639.65 cw(c3055.83,603.98) 3091.5,603.98 3091.5,580.97 cw(c3046,582.56) 3078.19,550.38 3070.63,542.81 ccw(c3088.89,524.55) 3063.06,524.55 v1(3063.06,522.96)
LPDDR4_DQ10_B: U1.A20 U12.V11 | length 1064.6
  Top Layer w4.2: U1.A20@2325.78,130.95 2390.24,66.5 2390.28,66.45 ccw(c2404.62,80.81) 2404.62,60.52 2457.8,60.52 cw(c2457.8,53.95) 2464.37,53.95 2464.37,48.48 ccw(c2470.37,48.48) 2470.37,42.48 2491.1,42.48 ccw(c2491.1,47.64) 2496.27,47.64 2496.27,82.76 ccw(c2489,82.76) 2489,90.03 v1(2475.06,90.03) ; U12.V11@3047.31,177.49 v1(3063.06,164.69)
  Signal L2 w4.7: v1(2475.06,90.03) 2551.09,14 ccw(c2572.74,35.65) 2572.74,5.03 3023.79,5.03 ccw(c3023.79,18.69) 3033.44,9.03 3050.17,25.75 ccw(c3035.27,40.65) 3056.34,40.65 3056.34,97.34 ccw(c3047.11,97.34) 3053.64,103.87 cw(c3063.99,114.19) 3049.36,114.2 3049.36,156.18 cw(c3057.88,156.18) 3057.88,164.69 v1(3063.06,164.69)
LPDDR4_DQ11_A: U1.T2 U12.F11 | length 1009.3
  Top Layer w4.2: U1.T2@2359.19,498.42 2359.19,503.74 cw(c2372.02,503.74) 2362.95,512.82 v1(2381.46,531.33) ; U12.F11@3047.31,484.58 v1(3063.06,497.37)
  Signal L2 w4.7: v1(2381.46,531.33) 2381.46,557.93 ; 2381.46,557.97 cw(c2402.34,557.98) 2387.59,572.76 2470.97,656.14 cw(c2497.98,629.16) 2497.98,667.34 2918.15,667.34 cw(c2918.15,636.61) 2939.88,658.34 ccw(c2953.91,672.37) 2953.91,652.53 3055.99,652.53 cw(c3055.99,605.08) 3103.44,605.08 3103.44,581.57 cw(c3042,580.78) 3085.44,537.32 ccw(c3102.65,520.14) 3078.33,520.14 cw(c3060.23,520.14) 3073.03,507.33 v1(3063.06,497.37)
LPDDR4_DQ11_B: U1.B20 U12.U11 | length 1053.1
  Top Layer w4.2: U1.B20@2314.65,142.09 2314.64,130.16 ccw(c2323.33,130.17) 2316.95,124.28 ; 2316.96,124.27 2330.35,110.28 2370.66,69.97 2388.22,52.41 ccw(c2406.04,70.08) 2406.04,44.99 ; 2406.08,44.99 v1@2432.36,44.99 ; U12.U11@3047.31,203.08 v1(3063.06,190.28)
  Signal L2 w4.7: v1@2432.36,44.99 2491.31,-13.96 ccw(c2504.49,-0.91) 2504.49,-19.46 ; 2504.52,-19.46 3030.69,-19.46 ccw(c3030.69,8.35) 3050.33,-11.34 3071.69,10.03 ccw(c3051.46,30.26) 3080.07,30.26 3080.07,170.73 ; v1(3063.06,190.28) 3069.37,187.41 cw(c3061.78,170.77) 3080.07,170.77
  other v1: 2433.36,44.99
LPDDR4_DQ12_A: U1.M1 U12.F9 | length 1020
  Top Layer w4.2: U1.M1@2414.86,465.02 2415.53,465.02 2450.83,500.31 cw(c2455.24,495.9) 2455.24,502.14 cw(c2455.24,495.9) 2459.66,500.31 2467.47,492.5 ccw(c2472.45,497.49) 2477.45,502.47 2471.59,508.32 cw(c2477.88,514.62) 2468.98,514.62 2468.98,522.31 ccw(c2463.5,522.31) 2468.82,523.63 ccw(c2463.5,522.31) 2463.5,527.79 ccw(c2463.5,519.63) 2457.73,525.4 v1(2452.36,520.03) ; v1(2968.58,471.78) U12.F9@2984.32,484.58
  Signal L2 w4.7: v1(2452.36,520.03) 2458,514.38 ccw(c2470.97,527.35) 2470.97,509.01 2525.66,509.01 cw(c2525.69,487.66) 2541.88,501.58 2545.41,498.05 ccw(c2564.8,517.47) 2564.8,490.03 ; 2564.83,490.03 2610.42,490.03 ; 2610.5,490.03 ccw(c2610.5,498.43) 2618.9,498.43 2618.9,518.55 cw(c2627.3,518.55) 2635.7,518.55 2635.7,492.68 ccw(c2644.1,492.68) 2652.5,492.68 2652.5,518.55 cw(c2660.9,518.55) 2669.3,518.55 2669.3,506.53 ccw(c2677.9,506.53) 2677.9,497.93 2703.63,497.93 cw(c2703.63,484.17) 2713.34,493.91 ; 2713.36,493.9 2717.57,489.68 ccw(c2729.78,501.89) 2729.78,484.63 2852.21,484.63 cw(c2852.21,474.26) 2862.58,474.26 2862.58,469.58 ccw(c2870.98,469.58) 2879.38,469.58 2879.38,476.63 cw(c2887.78,476.63) 2896.18,476.63 2896.18,424.92 ccw(c2904.58,424.92) 2912.98,424.92 2912.98,479.01 cw(c2921.38,479.01) 2929.78,479.01 2929.78,467.48 ccw(c2938.18,467.48) 2946.58,467.48 2946.58,478.7 cw(c2952.91,478.7) 2952.91,485.03 2962.36,485.03 cw(c2962.36,478.81) 2968.58,478.81 v1(2968.58,471.78)
LPDDR4_DQ12_B: U1.A15 U12.U9 | length 1049.7
  Top Layer w4.2: U1.A15@2381.46,186.63 2391.05,177.04 cw(c2380.13,166.13) 2395.56,166.13 2395.56,160.93 ccw(c2413.99,161) 2401.02,147.91 2408.98,139.95 ccw(c2416.44,147.34) 2416.44,136.84 2457.03,136.84 ccw(c2457,142.07) 2460.71,138.38 v1(2477.36,155.03) ; v1(2968.58,215.87) U12.U9@2984.32,203.08
  Signal L2 w4.7: v1(2477.36,155.03) 2477.36,191.75 cw(c2483.77,191.75) 2483.77,198.16 2493.58,198.16 cw(c2493.58,192.23) 2499.51,192.23 2499.51,182.21 ccw(c2507.91,182.21) 2516.31,182.21 2516.31,191.52 cw(c2524.71,191.52) 2533.11,191.52 2533.11,182.21 ccw(c2541.51,182.21) 2549.91,182.21 2549.91,191.52 cw(c2558.31,191.52) 2566.71,191.52 2566.71,182.21 ccw(c2575.11,182.21) 2583.51,182.21 2583.51,191.52 cw(c2591.91,191.52) 2600.31,191.52 2600.31,182.21 ccw(c2608.71,182.21) 2617.11,182.21 2617.11,191.52 cw(c2625.51,191.52) 2633.91,191.52 2633.91,185.93 ccw(c2642.31,185.93) 2642.31,177.53 ccw(c2642.31,185.93) 2650.71,185.93 cw(c2655.55,185.93) 2655.55,190.77 2742.72,190.77 cw(c2742.72,177.14) 2752.35,186.79 ; 2752.36,186.78 2756.36,182.79 ; 2756.37,182.77 ccw(c2769.05,195.48) 2769.05,177.53 2859.26,177.53 cw(c2859.26,169.13) 2867.66,169.13 2867.66,160.8 ccw(c2876.06,160.8) 2884.46,160.8 2884.46,178.25 cw(c2892.86,178.25) 2901.26,178.25 2901.26,153.43 ccw(c2909.66,153.43) 2918.06,153.43 2918.06,171.76 cw(c2926.46,171.76) 2934.86,171.76 2934.86,159.56 ccw(c2943.26,159.56) 2951.65,159.17 2951.66,209.17 cw(c2958.36,209.17) 2958.36,215.87 v1(2968.58,215.87)
LPDDR4_DQ13_A: U1.1F2 U12.E9 | length 1004.8
  Top Layer w4.2: v1(2968.58,522.96) U12.E9@2984.32,510.17
  Signal L2 w4.7: v1(2359.18,416.3) 2359.31,402.73 2359.31,402.66 ccw(c2371.13,403.07) 2362.83,394.64 2362.93,394.55 2371.82,386.67 ccw(c2377.35,392.86) 2383.04,386.81 2399.67,402.39 2434.74,437.46 ccw(c2428.03,444.04) 2437.36,445.13 ccw(c2421,443.13) 2432.64,454.81 2408.14,479.31 cw(c2416.57,487.73) 2404.65,487.73 cw(c2417.4,487.73) 2408.39,496.74 2410.78,499.14 2444.2,532.56 cw(c2452.99,523.76) 2452.99,536.2 cw(c2452.99,524.98) 2460.91,532.92 ccw(c2468.85,540.84) 2468.85,529.63 2491.18,529.63 ccw(c2491.21,537.3) 2498.86,537.86 2498.86,538.56 cw(c2507.59,538.56) 2507.59,547.3 cw(c2507.59,540.07) 2514.82,540.07 2514.82,530.56 ccw(c2523.3,530.56) 2531.79,530.56 2531.79,537.28 cw(c2540.53,537.28) 2549.28,537.28 2549.28,518.62 ccw(c2557.68,518.62) 2566.08,518.62 2566.08,539.99 cw(c2574.48,539.99) 2582.88,539.99 2582.88,515.94 ccw(c2591.28,515.94) 2599.68,515.94 2599.68,537.25 cw(c2608.08,537.25) 2608.08,545.65 2675.68,545.65 cw(c2675.68,537.98) 2683.34,537.98 2683.34,532.64 ccw(c2692.67,532.66) 2692.27,523.34 2692.39,523.34 2709.38,523.34 cw(c2709.38,509.93) 2718.87,519.41 2723.49,514.79 ccw(c2734.65,525.95) 2734.65,510.17 2884.86,510.17 2887.21,510.17 ccw(c2887.21,516.52) 2893.56,516.52 ; 2893.56,516.65 cw(c2899.91,516.65) 2906.26,516.65 ; 2906.26,516.52 ccw(c2912.61,516.52) 2912.61,510.17 2926.36,510.17 2963.64,510.17 ccw(c2963.64,515.11) 2968.58,515.11 v1(2968.58,522.96)
LPDDR4_DQ13_B: U1.B15 U12.V9 | length 1042.7
  Top Layer w4.2: U1.B15@2370.32,197.77 2381.62,197.6 cw(c2381.46,186.63) 2388.94,194.65 2401.86,182.61 2401.91,182.56 cw(c2376.71,157.35) 2412.36,157.35 v1(2412.36,155.03) ; v1(2968.58,164.69) U12.V9@2984.32,177.49
  Signal L2 w4.7: v1(2412.36,155.03) 2412.36,167.75 ccw(c2402.64,167.75) 2402.64,177.47 ccw(c2402.64,167.61) 2392.79,167.61 2392.79,144.52 cw(c2384.39,144.52) 2375.99,144.52 2375.99,169.83 ccw(c2369.81,169.83) 2369.81,176.01 2367.59,176.01 cw(c2367.56,184.44) 2367.59,192.86 2410.29,192.86 ccw(c2410.29,200.32) 2417.76,200.32 2417.76,207.62 cw(c2424.06,207.62) 2424.06,213.92 2661.68,213.92 cw(c2661.68,194.74) 2675.22,208.32 ccw(c2687.87,220.94) 2687.87,203.07 2851.77,203.07 ccw(c2851.77,209.96) 2858.65,209.96 2858.65,220.52 cw(c2867.59,220.52) 2867.59,229.46 cw(c2867.59,221.03) 2876.02,221.03 2876.02,212.53 ccw(c2884.42,212.53) 2892.82,212.53 2892.82,223.02 cw(c2901.22,223.02) 2909.62,223.02 2909.62,208.05 ccw(c2918.02,208.05) 2926.42,208.05 2926.42,214.41 cw(c2940.77,214.41) 2940.77,228.76 2970.66,228.76 cw(c2970.66,216.59) 2982.82,216.59 2982.82,192.58 cw(c2967.56,192.58) 2978.36,181.79 2973.75,177.18 ccw(c2986.24,164.69) v1(2968.58,164.69)
LPDDR4_DQ14_A: U1.1F1 U12.C9 | length 1004.9
  Top Layer w4.2: U12.C9@2984.32,561.35 v1(3000.07,574.14)
  Signal L2 w4.7: v1(2377.28,434.4) 2396.87,453.99 ccw(c2387.02,463.84) 2400.95,463.84 ccw(c2387.19,463.84) 2396.92,473.56 2394.24,476.24 cw(c2404.86,486.84) 2389.86,486.84 2389.86,488.81 cw(c2404.86,488.81) 2394.25,499.42 2495.13,600.3 cw(c2500.51,594.91) 2500.51,602.53 2503.67,602.53 cw(c2503.67,594.13) 2512.07,594.13 2512.07,586.64 ccw(c2520.47,586.64) 2528.87,586.64 2528.87,596.54 cw(c2537.27,596.54) 2545.67,596.54 2545.67,586.64 ccw(c2554.07,586.64) 2562.47,586.64 2562.47,596.54 cw(c2570.87,596.54) 2579.27,596.54 2579.27,586.64 ccw(c2587.67,586.64) 2596.07,586.64 2596.07,596.66 cw(c2604.47,596.66) 2612.87,596.66 2612.87,586.64 ccw(c2621.27,586.64) 2629.67,586.64 2629.67,597.08 cw(c2638.07,597.08) 2646.47,597.08 2646.47,585.37 ccw(c2654.87,585.37) 2663.27,585.37 2663.27,595.85 cw(c2669.94,595.85) 2669.94,602.53 2722.83,602.53 cw(c2722.83,594.56) 2729.19,599.37 cw(c2722.83,594.56) 2730.8,594.74 cw(c2722.83,594.56) 2730.8,594.56 2730.8,570.23 ; 2730.8,570.2 ccw(c2739.75,570.2) 2739.79,561.25 2897,561.25 cw(c2897,555.9) 2902.35,555.9 2902.35,552.81 ccw(c2907.7,552.81) 2913.05,552.81 2913.05,555.9 cw(c2918.4,555.9) 2918.4,561.25 2994.78,561.25 ccw(c2994.78,566.55) 3000.07,566.55 v1(3000.07,574.14)
LPDDR4_DQ14_B: U1.1C10 U12.Y9 | length 1035.4
  Top Layer w4.2: U12.Y9@2984.32,126.31 2998.37,114.18 v1(2998.41,114.24)
  Signal L2 w4.7: v1(2268.71,217.25) 2279.52,217.26 cw(c2279.52,199.54) 2292.04,212.07 2309.74,194.37 2317.04,187.2 ccw(c2325.39,195.64) 2327.26,183.92 ccw(c2325.17,196.56) 2334.26,187.53 2370.45,223.72 cw(c2378.54,215.63) 2378.54,227.07 ; 2378.58,227.07 cw(c2378.58,218.81) 2386.84,218.82 ; 2386.84,218.79 ccw(c2394.61,218.81) 2402.38,218.81 2402.38,222.11 cw(c2410.78,222.11) 2410.78,230.51 2668.82,230.51 ccw(c2668.82,245.51) 2679.42,234.89 2682.32,237.79 cw(c2691.21,228.88) 2691.21,241.47 2708.95,241.47 cw(c2708.95,232.83) 2717.59,232.83 2717.59,230.48 ccw(c2726.41,230.48) 2735.22,230.48 2735.22,232.07 cw(c2743.62,232.07) 2752.02,232.07 2752.02,230.48 ccw(c2760.42,230.48) 2768.82,230.48 2768.82,240.69 cw(c2782.3,240.69) 2782.3,254.17 2977.28,254.17 cw(c2977.28,245.75) 2985.7,245.75 2985.7,238.77 ccw(c2995.87,238.77) 2995.87,228.6 3009.65,228.6 cw(c3009.65,220.89) 3017.36,220.89 3017.36,188.83 cw(c3010.41,188.83) 3010.41,181.88 3003.34,181.88 ccw(c3003.34,162.65) 2984.11,162.65 2984.11,133.86 ; 2984.11,133.82 ccw(c2996.84,133.82) 2987.87,124.79 v1(2998.41,114.24)
LPDDR4_DQ15_A: U1.1G2 U12.B9 | length 1016.1
  Top Layer w4.2: v1(2967.36,670.03) 2967.36,659.09 ccw(c2974.41,659.09) 2974.41,652.04 2983.16,652.04 cw(c2983.16,647.46) 2987.74,647.46 2987.74,642.1 cw(c2983.58,642.1) 2983.58,637.94 2974.41,637.94 ccw(c2974.41,630.89) 2967.36,630.89 2967.36,594.36 ccw(c2974.78,594.36) 2974.78,586.94 U12.B9@2984.32,586.94
  Signal L2 w4.7: 2334.66,459.05 cw(c2319.09,443.51) 2341.09,443.51 v1(2341.09,434.4) ; 2334.65,459.06 2303.56,490.15 cw(c2312.59,499.22) 2299.79,499.23 cw(c2314.35,499.22) 2304.07,509.53 2467.89,673.35 cw(c2489.53,651.72) 2489.53,682.31 2539.51,682.31 ccw(c2539.51,688.66) 2545.86,688.66 2545.86,695.97 cw(c2552.21,695.97) 2558.56,695.97 2558.56,687.73 ccw(c2563.98,687.73) 2563.98,682.31 2788.26,682.31 ; 2788.29,682.31 ccw(c2788.29,717) 2812.81,692.47 cw(c2838.26,667.02) 2838.26,703.01 2955.49,703.01 ; 2955.53,703.01 cw(c2955.52,690.94) 2967.58,691.51 cw(c2962.89,691.31) 2967.59,691.31 v1@2967.59,670.26
LPDDR4_DQ15_B: U1.B16 U12.AA9 | length 1053.9
  Top Layer w4.2: U1.B16@2359.19,186.63 2384.97,160.84 cw(c2379.22,155.09) 2387.36,155.09 ccw(c2400.84,155.09) 2389.68,147.52 ccw(c2400.84,155.09) 2391.29,145.57 2407.82,129.05 ccw(c2413.79,135.08) 2413.84,126.59 2468.3,126.59 ccw(c2468.33,140.08) 2477.88,130.56 v1(2502.36,155.03) ; v1(2968.58,113.51) U12.AA9@2984.32,100.72
  Signal L2 w4.7: v1(2502.36,155.03) 2525.14,155.03 cw(c2525.14,150.07) 2530.1,150.07 2530.1,145.07 ccw(c2538.5,145.07) 2546.9,145.07 2546.9,151.63 cw(c2555.3,151.63) 2563.7,151.63 2563.7,136.65 ccw(c2572.1,136.65) 2580.5,136.65 2580.5,151.63 cw(c2588.9,151.63) 2597.3,151.63 2597.3,137.32 ccw(c2605.7,137.32) 2614.1,137.32 2614.1,151.63 cw(c2622.5,151.63) 2630.9,151.63 2630.9,137.32 ccw(c2639.3,137.32) 2647.7,137.32 2647.7,151.63 cw(c2656.1,151.63) 2656.1,160.03 2666.22,160.03 cw(c2666.22,151.63) 2674.62,151.63 2674.62,140.93 ccw(c2683.02,140.93) 2691.42,140.93 2691.42,151.63 cw(c2699.82,151.63) 2699.82,160.03 2722.3,160.03 cw(c2722.3,152.92) 2729.4,152.92 2729.4,130.33 ccw(c2736.27,130.33) 2736.27,123.46 2748.5,123.46 cw(c2748.5,117.14) 2754.83,117.14 2754.83,106.35 ccw(c2763.23,106.35) 2771.63,106.35 2771.63,118.28 cw(c2779.57,118.28) 2779.57,126.23 2810.37,126.23 ccw(c2810.34,131.83) 2810.54,126.23 cw(c2811.1,113.54) 2811.35,126.24 2812.2,126.23 ccw(c2812.28,131.83) 2812.28,126.23 cw(c2812.28,115.83) 2819.62,123.19 ccw(c2826.7,130.25) 2826.7,120.25 2827.41,120.25 ; 2826.91,120.25 ccw(c2826.91,130.25) 2833.99,123.18 ; 2834.2,123.4 cw(c2841.27,116.33) 2838.87,126.03 2841.79,126.22 ; 2841.87,126.2 ccw(c2841.83,131.8) 2842.04,126.2 cw(c2842.59,113.51) 2842.84,126.21 2843.69,126.2 ccw(c2843.78,131.8) 2843.78,126.2 cw(c2843.78,115.8) 2851.12,123.17 ccw(c2858.2,130.23) 2858.2,120.23 2858.91,120.23 ; 2858.41,120.23 ccw(c2858.41,130.23) 2865.48,123.16 ; 2865.7,123.37 cw(c2872.77,116.3) 2870.36,126.01 2873.29,126.19 2887.17,126.19 cw(c2887.17,118.9) 2894.46,118.9 2894.46,109.12 ccw(c2902.86,109.12) 2911.26,109.12 2911.26,122.85 cw(c2919.66,122.85) 2928.06,122.85 2928.06,109.12 ccw(c2936.46,109.12) 2944.86,109.12 2944.86,119.17 cw(c2951.42,119.17) 2951.42,125.73 2962.35,125.73 cw(c2962.35,119.28) 2968.8,119.28 v1@2968.8,114.89
LPDDR4_DQS0_A_N: U1.H1 U12.E3 | length 744.6
  Top Layer w3.5: U1.H1@2459.41,420.48 2460.51,420.47 2472.46,432.2 2475.26,435 ccw(c2462,448.26) 2479.22,440.83 ccw(c2462,448.26) 2480.76,448.26 2480.76,455.45 cw(c2486.94,455.45) v1(2482.57,459.82) ; U12.E3@2795.34,510.17 v1(2811.1,522.96)
  Signal L1 w3.5: v1@2482.57,460.84 v1(2482.57,459.82) 2490.4,468.57 2504.74,482.98 2511.86,490.14 2513.66,491.94 ; 2513.69,491.96 2514.13,492.41 ccw(c2502.19,504.37) 2519.09,504.37 ; 2519.09,504.42 2519.09,562.53 cw(c2531.45,562.53) 2522.7,571.26 ; 2522.71,571.27 2552.55,601.11 2558.32,606.88 cw(c2566.45,598.75) 2566.45,610.25 2583.05,610.25 cw(c2583.05,604.5) 2588.8,604.53 2588.8,602.03 2588.8,601.42 2588.8,586.51 ccw(c2605.62,586.52) 2605.89,569.7 ; 2605.91,569.7 ccw(c2605.59,587.42) 2623.3,587.42 2623.3,601.08 2623.3,604.58 cw(c2629.05,604.58) 2629.05,610.33 cw(c2629.05,604.58) 2634.8,604.58 2634.8,601.43 ; 2634.8,601.38 2634.8,598.95 2634.8,590.34 ccw(c2652.16,590.42) 2652.21,573.07 ccw(c2652.16,590.21) 2669.3,590.21 2669.3,604.58 cw(c2675.05,604.58) 2675.05,610.33 cw(c2675.05,604.58) 2680.76,605.26 cw(c2677.29,604.82) 2680.79,605.01 2680.8,604.74 cw(c2677.3,604.58) 2680.8,604.58 2680.8,593.88 ccw(c2698.09,593.89) 2698.16,576.6 ccw(c2698.09,593.83) 2715.31,593.77 2715.31,604.57 cw(c2718.81,604.57) 2715.32,604.79 2715.33,604.99 cw(c2718.82,604.77) 2715.35,605.18 ; 2715.35,605.21 cw(c2721.05,604.5) 2718.87,609.82 cw(c2721.05,604.5) 2721.05,610.25 2725.74,610.25 cw(c2725.74,607.4) 2728.59,607.4 2728.59,601.4 ccw(c2733.34,601.41) 2733.34,596.66 ; 2733.55,596.66 ccw(c2733.55,601.19) 2738.09,601.19 2738.09,607.19 cw(c2741.22,607.19) 2741.22,610.32 2746.01,610.32 cw(c2746.01,604.73) 2751.6,604.73 2751.6,592.41 ccw(c2759.2,592.41) 2753.83,587.04 2771.53,569.33 ccw(c2779.57,577.45) 2779.57,566.03 2794.02,566.03 cw(c2794.02,561.08) 2798.97,561.08 2798.97,538.7 ccw(c2804.81,538.7) 2800.67,534.57 v1@2811.1,524.14
LPDDR4_DQS0_A_P: U1.H2 U12.D3 | length 743.3
  Top Layer w3.5: U1.H2@2448.27,409.34 2447.91,420.09 cw(c2459.41,420.48) 2451.29,428.63 v1(2467.57,444.82) ; U12.D3@2795.34,535.76 v1@2811.08,548.54
  Signal L1 w3.5: v1(2467.57,444.82) 2467.57,456.06 2467.57,457.63 cw(c2478.38,457.63) 2470.73,465.27 2505.55,500.09 ccw(c2500.6,505.03) 2507.59,505.03 2507.59,567.7 cw(c2518.97,567.7) 2510.92,575.74 2518.86,583.68 2537.5,602.32 2551.77,616.59 2551.81,616.63 cw(c2564.26,604.05) 2564.26,621.75 2583.05,621.75 cw(c2583.05,604.5) 2600.3,604.58 cw(c2583.05,604.5) 2600.3,604.5 2600.3,602.03 2600.3,601.41 2600.3,586.52 ccw(c2605.62,586.52) 2605.74,581.2 ccw(c2605.59,587.42) 2611.8,587.42 2611.8,601.08 2611.8,604.58 cw(c2629.05,604.58) 2629.05,621.83 cw(c2629.05,604.58) 2646.3,604.58 2646.3,601.43 2646.3,598.95 2646.3,590.38 ccw(c2652.16,590.42) 2652.18,584.57 ccw(c2652.16,590.21) 2657.8,590.21 2657.8,604.58 cw(c2675.05,604.58) 2675.05,621.83 cw(c2675.05,604.58) 2692.18,606.64 cw(c2677.29,604.82) 2692.27,605.64 2692.28,605.44 cw(c2677.3,604.58) 2692.3,604.58 2692.3,593.88 ccw(c2698.09,593.89) 2698.11,588.1 ccw(c2698.09,593.83) 2703.81,593.8 2703.81,604.57 cw(c2718.81,604.57) 2703.84,605.51 2703.85,605.7 cw(c2718.82,604.77) 2703.94,606.65 cw(c2721.05,604.5) 2721.05,621.75 2739.57,621.75 2747.69,621.74 cw(c2747.68,618.24) 2747.83,621.73 cw(c2747.17,605.82) 2763.1,605.82 2763.1,605.74 2763.1,597.17 ccw(c2770.7,597.17) 2765.32,591.81 ; 2765.33,591.8 2776.22,580.9 ccw(c2784.38,589.07) 2784.38,577.53 2797.55,577.53 cw(c2797.55,564.61) 2810.47,564.61 2810.47,549.15 v1(2811.1,548.52)
LPDDR4_DQS0_B_N: U1.A12 U12.V3 | length 849.3
  Top Layer w3.5: U1.A12@2414.86,220.04 U1.A12@2416.08,218.82 ; 2416.08,214.45 2421.93,208.59 2421.93,202.48 2423.98,200.43 2431.95,200.43 v1(2432.36,200.03) ; U12.V3@2795.34,177.49 v1(2811.1,190.28)
  Signal L1 w3.5: v1@2432.67,198.84 v1(2432.36,200.03) 2438.74,202.72 ccw(c2437.38,205.95) 2440.88,205.95 2440.88,209.96 cw(c2445.63,209.68) 2450.38,209.68 ccw(c2454.27,209.68) 2454.27,205.79 2465.75,205.79 cw(c2465.75,188.54) 2483,188.54 2483,184 ccw(c2488.75,184) 2494.5,184 2494.5,193.52 cw(c2511.75,193.52) 2529,193.52 2529,168.1 ccw(c2534.75,168.1) 2540.5,168.1 2540.5,193.52 cw(c2557.75,193.52) 2575,193.52 2575,138.28 ccw(c2580.75,138.28) 2586.5,138.28 2586.5,193.52 cw(c2603.75,193.52) 2621,193.52 2621,138.28 ccw(c2626.75,138.28) 2632.5,138.28 2632.5,188.54 cw(c2649.75,188.54) 2649.75,205.79 2735.28,205.79 cw(c2735.28,187.4) 2748.29,200.41 2748.33,200.36 2769.52,179.17 ccw(c2775.54,185.25) 2775.54,176.7 2804.41,176.7 ccw(c2804.41,183.38) 2811.1,183.38 v1(2811.1,190.28)
LPDDR4_DQS0_B_P: U1.A13 U12.W3 | length 852.7
  Top Layer w3.5: U1.A13@2403.73,208.9 2405.36,208.9 2410.43,203.83 2410.43,197.72 2432.36,175.8 v1(2432.36,175.03) ; U12.W3@2795.34,151.9 v1(2811.1,164.69)
  Signal L1 w3.5: v1(2432.36,175.03) 2433.4,179.45 cw(c2452.15,175.03) 2452.15,194.29 2465.75,194.29 cw(c2465.75,188.54) 2471.5,188.54 2471.5,184 ccw(c2488.75,184) 2506,184 2506,193.52 cw(c2511.75,193.52) 2517.5,193.52 2517.5,168.1 ccw(c2534.75,168.1) 2552,168.1 2552,193.52 cw(c2557.75,193.52) 2563.5,193.52 2563.5,138.28 ccw(c2580.75,138.28) 2598,138.28 2598,193.52 cw(c2603.75,193.52) 2609.5,193.52 2609.5,138.28 ccw(c2626.75,138.28) 2644,138.28 2644,188.54 cw(c2649.75,188.54) 2649.75,194.29 2731.98,194.29 2732.98,194.29 cw(c2732.98,181.84) 2741.77,190.66 2742.49,189.94 2763.89,168.54 ; 2763.91,168.52 ccw(c2771.97,176.62) 2771.97,165.2 v1@2810.59,165.2
LPDDR4_DQS1_A_N: U1.N2 U12.E10 | length 1014
  Top Layer w3.5: U1.N2@2392.59,465.02 2392.59,476.72 cw(c2404.08,476.72) 2393.97,482.17 cw(c2404.08,476.72) 2395.96,484.84 2409.4,498.28 cw(c2425.68,482) 2425.68,505.03 v1(2437.36,505.03) ; v1(3000.07,497.37) U12.E10@3015.82,510.17
  Signal L2 w3.5: v1(2437.36,505.03) 2437.36,499.79 ccw(c2441.3,499.79) 2438.5,497.02 2443.1,492.42 ccw(c2448.72,498.21) 2448.72,490.14 2525.32,490.14 cw(c2525.32,473.51) 2537.12,485.23 2558.34,464 2558.95,463.39 cw(c2549.9,454.33) 2562.7,454.33 2562.7,453.46 2562.7,392.15 ccw(c2572.14,392.15) 2572.14,382.72 2590.25,382.72 ; 2590.43,382.72 cw(c2590.5,359.9) 2606.69,375.98 2606.8,375.87 2610.23,372.43 ccw(c2626.4,388.6) 2626.4,365.74 2633.9,365.74 ccw(c2633.9,371.49) 2639.65,371.49 cw(c2656.9,371.5) 2674.15,371.5 ccw(c2679.9,371.49) 2679.9,365.74 2745.06,365.74 2752.94,365.74 ccw(c2752.94,370.76) 2757.96,370.76 2757.96,370.89 cw(c2764.44,371.5) 2770.92,370.86 2770.92,370.74 ccw(c2775.93,370.74) 2775.93,365.74 2783.82,365.74 2876.71,365.74 ccw(c2876.71,370.49) 2881.46,370.49 2881.46,380.46 cw(c2897.71,380.46) 2913.96,380.46 2913.96,368.33 ccw(c2918.71,368.33) 2923.46,368.33 2923.46,385.46 cw(c2939.71,385.46) 2955.96,385.46 2955.96,370.49 ccw(c2960.71,370.49) 2960.71,365.74 2964.69,365.74 ccw(c2964.69,371.19) 2970.14,371.19 2970.14,420.56 2970.14,421.96 cw(c2981.37,422) 2973.43,429.94 3006.44,462.95 ccw(c3000.73,468.67) 3008.81,468.67 3008.81,488.63 ccw(c3000.07,488.63) 3005.1,495.78 ccw(c3000.07,488.63) v1(3000.07,497.37)
LPDDR4_DQS1_A_P: U1.N1 U12.D10 | length 1008
  Top Layer w3.5: U1.N1@2404.09,476.15 2404.09,476.72 2414.48,487.1 cw(c2421.55,480.02) 2421.55,490.03 v1(2422.36,490.03) ; v1(3000.07,522.96) U12.D10@3015.82,535.76
  Signal L2 w3.5: v1(2422.36,490.03) 2427.59,490.03 cw(c2427.59,486.09) 2430.37,488.88 2434.97,484.29 2435.21,484.05 ccw(c2448.72,498.21) 2448.72,478.64 2522.45,478.64 cw(c2522.45,466.58) 2530.97,475.11 2547.29,458.78 cw(c2537.85,449.34) 2551.2,449.34 2551.2,392.15 ccw(c2572.14,392.15) 2572.14,371.22 2588.33,371.22 ; 2588.42,371.22 cw(c2588.41,354.85) 2599.98,366.42 2600.02,366.38 2603.18,363.22 ccw(c2624.79,384.72) 2624.79,354.24 2633.9,354.24 ccw(c2633.9,371.49) 2651.15,371.49 cw(c2656.9,371.5) 2662.65,371.5 ccw(c2679.9,371.49) 2679.9,354.24 2876.71,354.24 ccw(c2876.71,370.49) 2892.96,370.49 2892.96,380.46 cw(c2897.71,380.46) 2902.46,380.46 2902.46,368.33 ccw(c2918.71,368.33) 2934.96,368.33 2934.96,385.46 cw(c2939.71,385.46) 2944.46,385.46 2944.46,370.49 ccw(c2960.71,370.49) 2960.71,354.24 2965.01,354.24 ccw(c2965.01,370.87) 2981.64,370.87 2981.64,419.88 cw(c2986.51,419.87) 2983.06,423.31 3016.1,456.35 ccw(c3005.94,466.51) 3020.31,466.51 3020.31,490.12 ccw(c2992.82,490.12) 3012.26,509.56 3000.07,521.75 v1(3000.07,522.96)
LPDDR4_DQS1_B_N: U1.B17 U12.V10 | length 1059.3
  Top Layer w3.5: U1.B17@2348.05,175.49 2347.57,175.01 2347.57,165.35 ccw(c2362.57,165.35) 2351.95,154.75 2395.12,111.51 ccw(c2412.9,129.17) 2412.97,104.11 v1@2500.27,104.11 ; U12.V10@3015.82,177.49 v1(3031.57,164.69)
  Signal L2 w3.5: v1(2501.36,103.11) 2512.21,102.92 ccw(c2512.7,130.45) 2512.69,102.91 2554.6,102.88 2559.42,102.88 2565.57,102.88 cw(c2565.57,97.66) 2570.75,98.37 cw(c2567.28,97.9) 2570.78,97.91 2570.79,91.51 2570.79,80.55 ; 2570.79,80.54 2570.79,80.27 ccw(c2587.04,80.27) 2603.29,80.27 2603.29,99.53 cw(c2608.04,99.53) 2612.79,99.53 2612.79,80.77 ccw(c2629.04,80.77) 2645.29,80.77 2645.29,98.4 cw(c2650.04,98.4) 2654.79,98.4 2654.79,80.77 ccw(c2671.04,80.77) 2687.29,80.77 2687.29,98.14 cw(c2692.04,98.14) 2692.04,102.89 2698.23,102.89 2715.64,102.91 cw(c2715.64,97.85) 2720.7,97.85 2720.7,58.5 ccw(c2742.44,58.61) 2741.4,36.89 ccw(c2742.08,51.88) 2742.03,36.88 2748.37,36.88 2941.99,36.88 ccw(c2941.9,76.45) 2969.71,48.3 2970.08,48.67 3014.02,92.61 ccw(c2995.85,110.81) 3021.57,110.81 3021.57,154.69 cw(c3031.57,154.69) v1(3031.57,164.69)